# Altium PCB updated_pcb_file.PcbDoc (part 3 of 5)
Units mil, origin at the board's own origin, x right, y up, seen from the top; angles counter-clockwise.
Board outline 3385.83 x 2125.98 mil, 4 copper layers (L1 (TOP), L2 (GND), L3 (PWR), L4 (BOTTOM)), stack 38.228 mil thick; 154 components, 143 nets, 726 pads, 326 vias.
Unrouted connection lines stored in the file: 46.
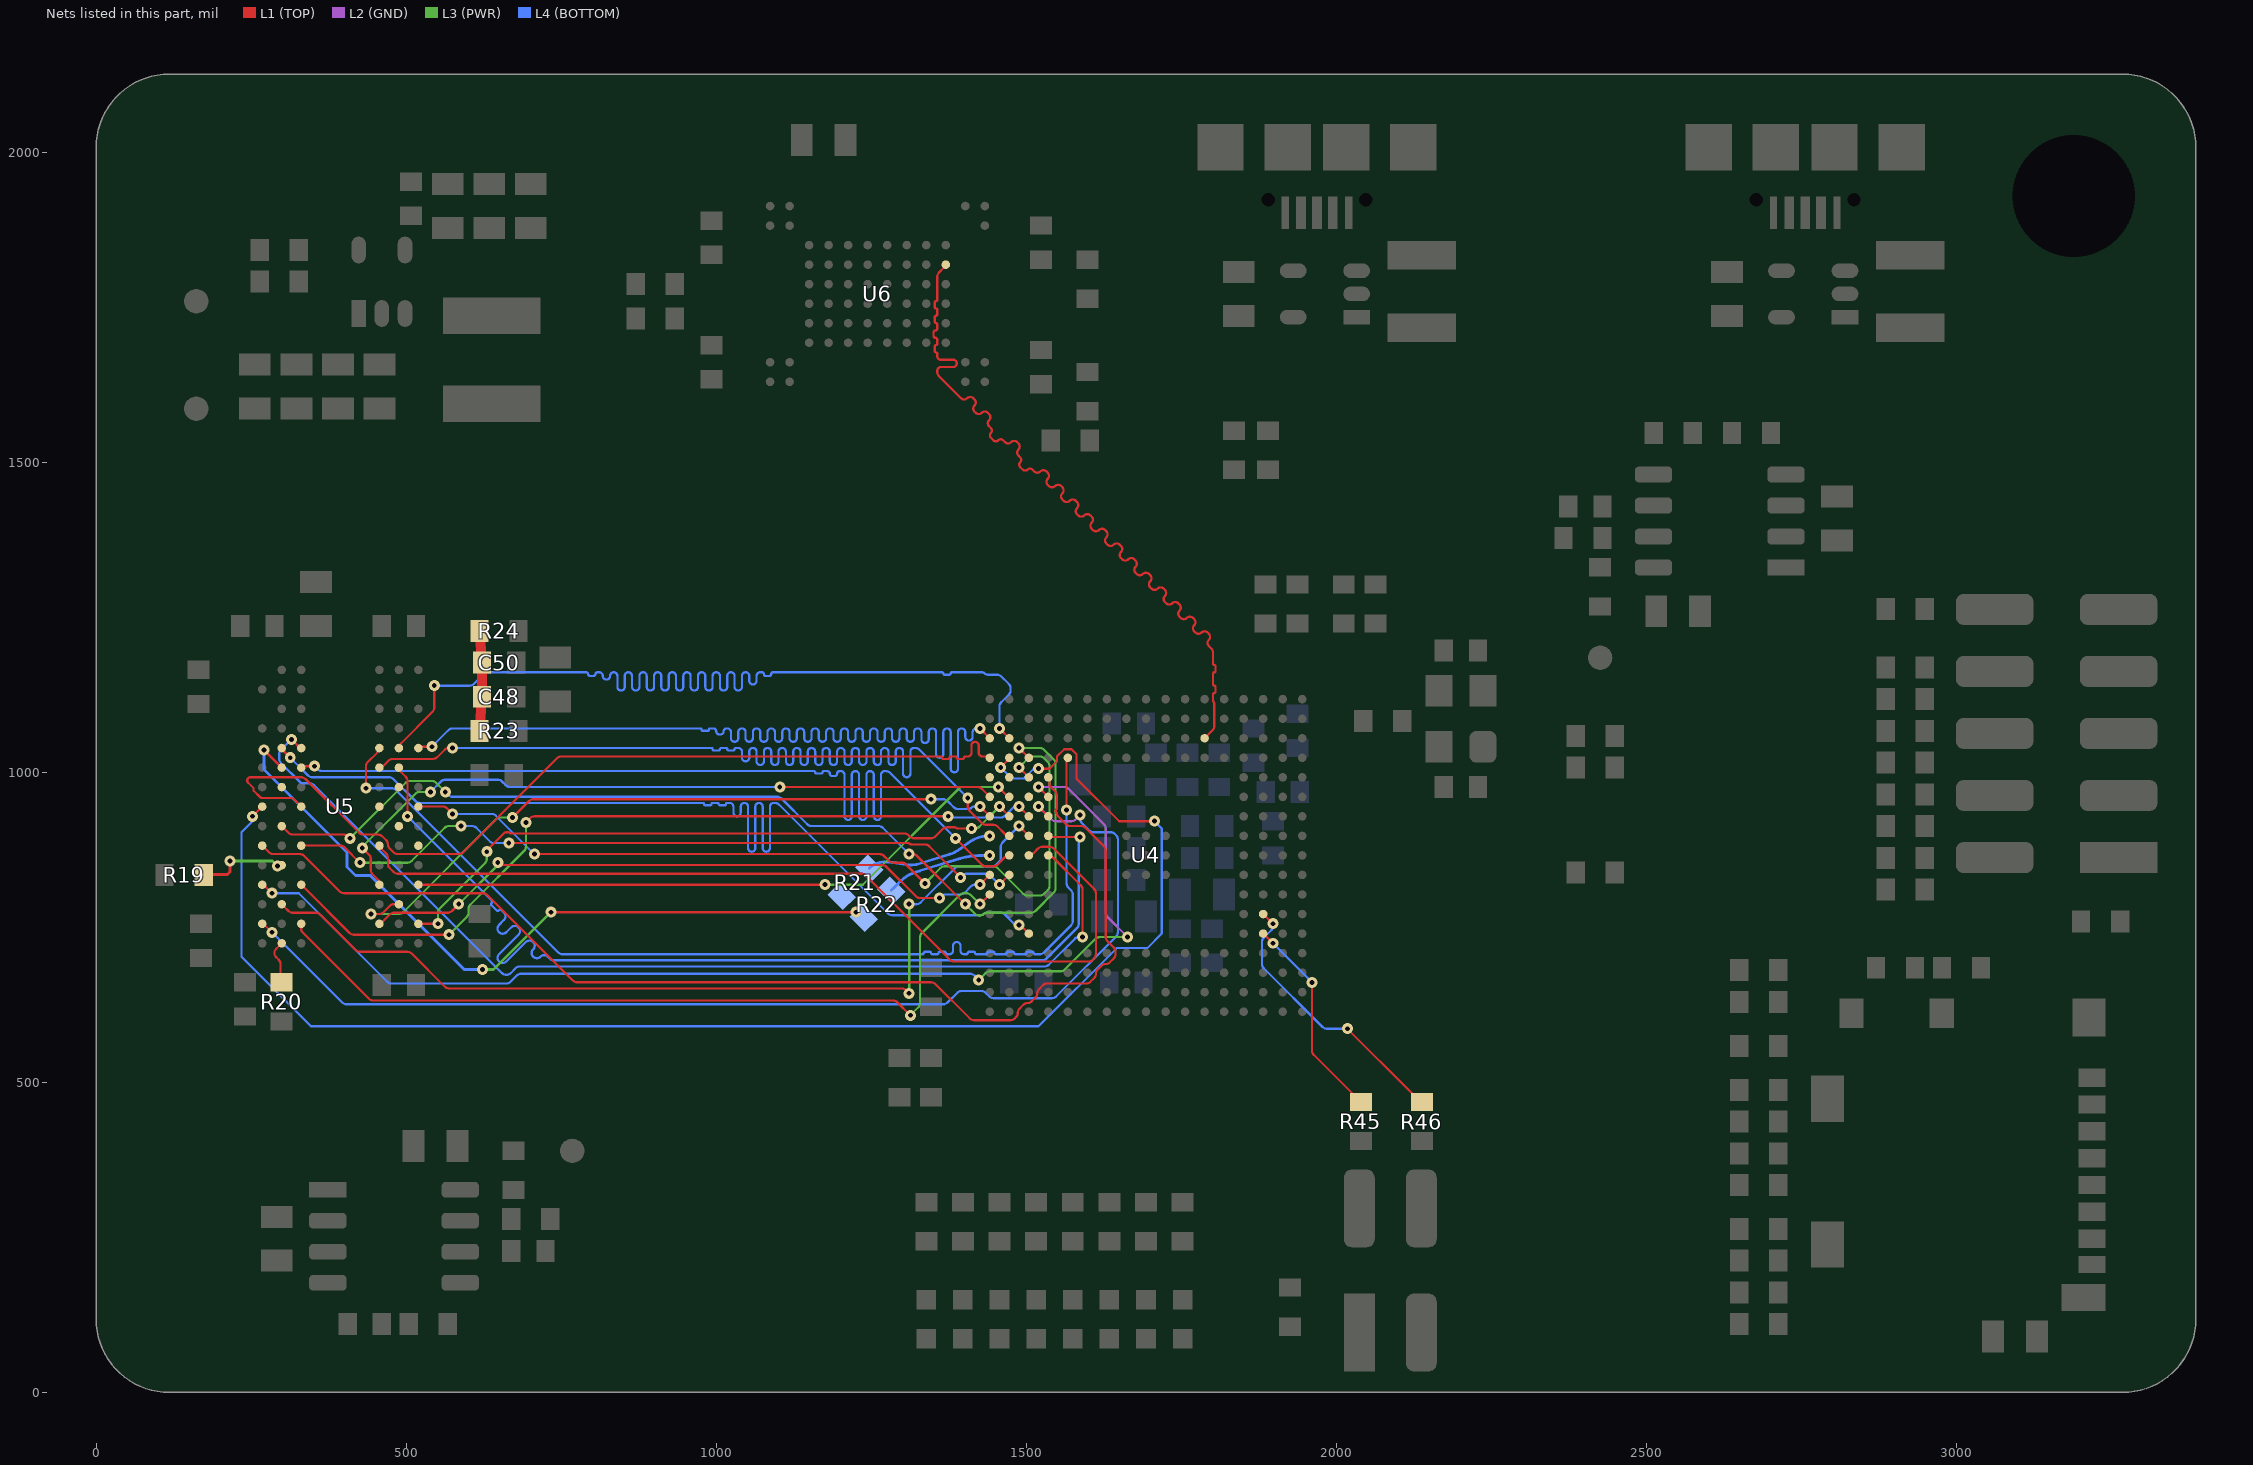
[diagram p5: the nets of this part, all layers, seen from the top]

## Via types
v1: diameter 17.72, hole 7.87, L1 (TOP) to L4 (BOTTOM), 310 vias
v2: diameter 13.78, hole 3.94, L1 (TOP) to L3 (PWR), 7 vias
v3: diameter 17.72, hole 7.87, L1 (TOP) to L3 (PWR), 5 vias
v4: diameter 13.78, hole 3.94, L2 (GND) to L4 (BOTTOM), 3 vias
v5: diameter 13.78, hole 3.94, L3 (PWR) to L4 (BOTTOM), 1 vias

## Nets (pads, with @x,y where several pads share a name; then routed paths per layer and width w, separated by ;. In a path a pad name is that pad's centre, name@x,y a point inside that pad or via, vN(x,y) a via of type N, cw(c..) or ccw(c..) an arc to the next point about the centre after c; other vN are vias at no path point) (continued)
DRAM_BA0: U4.B15 U5.L2 | length 1666.4
  L1 (TOP) w3.54: U5.L2@488.19,1039.37 489.42,1043.07 cw(c498.76,1039.96) 491.8,1046.92 542.39,1097.51 ccw(c535.43,1104.47) 545.27,1104.47 v1(545.27,1139.76) ; v1(1456.69,1070.87) U4.B15@1472.44,1055.12
  L4 (BOTTOM) w3.54: v1(545.27,1139.76) 602.22,1139.76 ccw(c602.22,1149.61) 609.18,1142.65 625.07,1158.53 cw(c632.03,1151.57) 632.03,1161.42 790.35,1161.42 cw(c790.35,1158.46) 793.31,1158.46 ccw(c796.26,1158.46) 796.26,1155.51 802.16,1155.51 ccw(c802.16,1158.46) 805.12,1158.46 cw(c808.07,1158.46) 808.07,1161.42 811.02,1161.42 cw(c811.02,1155.51) 816.93,1155.51 ccw(c822.83,1155.51) 822.83,1149.61 ccw(c822.83,1155.51) 828.74,1155.51 cw(c834.65,1155.51) 834.65,1161.42 cw(c834.65,1155.51) 840.55,1155.51 840.55,1137.79 ccw(c846.46,1137.79) 846.46,1131.89 ccw(c846.46,1137.79) 852.36,1137.79 852.36,1155.51 cw(c858.27,1155.51) 858.27,1161.42 cw(c858.27,1155.51) 864.17,1155.51 864.17,1137.79 ccw(c870.08,1137.79) 870.08,1131.89 ccw(c870.08,1137.79) 875.98,1137.79 875.98,1155.51 cw(c881.89,1155.51) 881.89,1161.42 cw(c881.89,1155.51) 887.79,1155.51 887.79,1137.79 ccw(c893.7,1137.79) 893.7,1131.89 ccw(c893.7,1137.79) 899.61,1137.79 899.61,1155.51 cw(c905.51,1155.51) 905.51,1161.42 cw(c905.51,1155.51) 911.42,1155.51 911.42,1137.79 ccw(c917.32,1137.79) 917.32,1131.89 ccw(c917.32,1137.79) 923.23,1137.79 923.23,1155.51 cw(c929.13,1155.51) 929.13,1161.42 cw(c929.13,1155.51) 935.04,1155.51 935.04,1137.79 ccw(c940.94,1137.79) 940.94,1131.89 ccw(c940.94,1137.79) 946.85,1137.79 946.85,1155.51 cw(c952.76,1155.51) 952.76,1161.42 cw(c952.76,1155.51) 958.66,1155.51 958.66,1137.79 ccw(c964.57,1137.79) 964.57,1131.89 ccw(c964.57,1137.79) 970.47,1137.79 970.47,1155.51 cw(c976.38,1155.51) 976.38,1161.42 cw(c976.38,1155.51) 982.28,1155.51 982.28,1137.79 ccw(c988.19,1137.79) 988.19,1131.89 ccw(c988.19,1137.79) 994.09,1137.79 994.09,1155.51 cw(c1000,1155.51) 1000,1161.42 cw(c1000,1155.51) 1005.9,1155.51 1005.9,1137.79 ccw(c1011.81,1137.79) 1011.81,1131.89 ccw(c1011.81,1137.79) 1017.72,1137.79 1017.72,1155.51 cw(c1023.62,1155.51) 1023.62,1161.42 cw(c1023.62,1155.51) 1029.53,1155.51 1029.53,1137.79 ccw(c1035.43,1137.79) 1035.43,1131.89 ccw(c1035.43,1137.79) 1041.34,1137.79 1041.34,1155.51 cw(c1047.24,1155.51) 1047.24,1161.42 cw(c1047.24,1155.51) 1053.15,1155.51 1053.15,1147.64 ccw(c1059.05,1147.64) 1059.05,1141.73 ccw(c1059.05,1147.64) 1064.96,1147.64 1064.96,1155.51 cw(c1070.87,1155.51) 1070.87,1161.42 1073.82,1161.42 cw(c1073.82,1158.46) 1076.77,1158.46 ccw(c1079.72,1158.46) 1079.72,1155.51 1085.63,1155.51 ccw(c1085.63,1158.46) 1088.58,1158.46 cw(c1091.53,1158.46) 1091.53,1161.42 1364.17,1161.42 cw(c1364.17,1159.45) 1366.14,1159.45 ccw(c1368.11,1159.45) 1368.11,1157.48 1375.98,1157.48 ccw(c1375.98,1159.45) 1377.95,1159.45 cw(c1379.92,1159.45) 1379.92,1161.42 1428.32,1161.42 cw(c1428.32,1154.7) 1433.07,1159.45 ccw(c1437.82,1164.2) 1437.82,1157.48 1452.62,1157.48 cw(c1452.62,1147.64) 1459.58,1154.6 1471.53,1142.65 cw(c1464.57,1135.69) 1474.41,1135.69 1474.41,1132.03 cw(c1464.57,1132.03) 1471.53,1125.07 1459.58,1113.12 ccw(c1466.53,1106.16) 1456.69,1106.16 v1(1456.69,1070.87)
DRAM_BA1: U4.E14 U5.L3 | length 1669.7
  L1 (TOP) w3.54: v1(435.04,974.41) 435.04,1009.7 cw(c444.88,1009.7) 437.92,1016.66 453.08,1031.82 ccw(c446.12,1038.78) 455.46,1035.67 U5.L3@456.69,1039.37 ; v1(1564.96,938.98) 1564.96,1016.12 cw(c1574.8,1016.12) 1565.47,1019.23 U4.E14@1566.93,1023.62
  L4 (BOTTOM) w3.54: v1(435.04,974.41) 476.24,974.41 cw(c476.24,964.57) 483.2,971.53 745.15,709.58 ccw(c752.11,716.54) 752.11,706.69 1332.68,706.69 ccw(c1332.68,708.66) 1334.64,708.66 cw(c1336.61,708.66) 1336.61,710.63 1344.49,710.63 cw(c1344.49,708.66) 1346.46,708.66 ccw(c1348.42,708.66) 1348.42,706.69 1356.3,706.69 ccw(c1356.3,708.66) 1358.27,708.66 cw(c1360.24,708.66) 1360.24,710.63 1368.11,710.63 cw(c1368.11,708.66) 1370.08,708.66 ccw(c1372.05,708.66) 1372.05,706.69 1375.98,706.69 ccw(c1375.98,712.6) 1381.89,712.6 1381.89,720.47 cw(c1387.79,720.47) 1387.79,726.38 cw(c1387.79,720.47) 1393.7,720.47 1393.7,712.6 ccw(c1399.61,712.6) 1399.61,706.69 1403.54,706.69 ccw(c1403.54,708.66) 1405.51,708.66 cw(c1407.48,708.66) 1407.48,710.63 1415.35,710.63 cw(c1415.35,708.66) 1417.32,708.66 ccw(c1419.29,708.66) 1419.29,706.69 1435.04,706.69 ccw(c1435.04,708.66) 1437.01,708.66 cw(c1438.98,708.66) 1438.98,710.63 1446.85,710.63 cw(c1446.85,708.66) 1448.82,708.66 ccw(c1450.79,708.66) 1450.79,706.69 1466.53,706.69 ccw(c1466.53,708.66) 1468.5,708.66 cw(c1470.47,708.66) 1470.47,710.63 1478.35,710.63 cw(c1478.35,708.66) 1480.31,708.66 ccw(c1482.28,708.66) 1482.28,706.69 1498.03,706.69 ccw(c1498.03,708.66) 1500,708.66 cw(c1501.97,708.66) 1501.97,710.63 1509.84,710.63 cw(c1509.84,708.66) 1511.81,708.66 ccw(c1513.78,708.66) 1513.78,706.69 1521.51,706.69 ccw(c1521.51,716.54) 1528.47,709.58 1571.92,753.02 ccw(c1564.96,759.98) 1574.8,759.98 1574.8,803.01 ccw(c1564.96,803.01) 1571.92,809.97 1567.84,814.05 cw(c1574.8,821.01) 1564.96,821.01 v1(1564.96,938.98)
DRAM_BA2: U4.A15 U5.L1 | length 1669.1
  L1 (TOP) w3.54: U5.L1@519.69,1039.37 524.07,1040.83 cw(c527.19,1031.5) 527.19,1041.34 v1(541.34,1041.34) ; v1(1425.2,1070.87) U4.A15@1440.94,1055.12
  L4 (BOTTOM) w3.54: v1(541.34,1041.34) 567.98,1067.98 cw(c574.94,1061.02) 574.94,1070.87 974.41,1070.87 cw(c974.41,1068.9) 976.38,1068.9 ccw(c978.35,1068.9) 978.35,1066.93 986.22,1066.93 ccw(c986.22,1068.9) 988.19,1068.9 cw(c990.16,1068.9) 990.16,1070.87 995.08,1070.87 cw(c995.08,1065.94) 1000,1065.94 ccw(c1004.92,1065.94) 1004.92,1061.02 1006.89,1061.02 ccw(c1006.89,1065.94) 1011.81,1065.94 cw(c1016.73,1065.94) 1016.73,1070.87 1017.72,1070.87 cw(c1017.72,1064.96) 1023.62,1064.96 1023.62,1055.12 ccw(c1029.53,1055.12) 1029.53,1049.21 ccw(c1029.53,1055.12) 1035.43,1055.12 1035.43,1064.96 cw(c1041.34,1064.96) 1041.34,1070.87 cw(c1041.34,1064.96) 1047.24,1064.96 1047.24,1055.12 ccw(c1053.15,1055.12) 1053.15,1049.21 ccw(c1053.15,1055.12) 1059.05,1055.12 1059.05,1064.96 cw(c1064.96,1064.96) 1064.96,1070.87 cw(c1064.96,1064.96) 1070.87,1064.96 1070.87,1055.12 ccw(c1076.77,1055.12) 1076.77,1049.21 ; 1076.77,1049.21 ccw(c1076.77,1055.12) 1082.68,1055.12 1082.68,1064.96 cw(c1088.58,1064.96) 1088.58,1070.87 cw(c1088.58,1064.96) 1094.49,1064.96 1094.49,1055.12 ccw(c1100.39,1055.12) 1100.39,1049.21 ccw(c1100.39,1055.12) 1106.3,1055.12 1106.3,1064.96 cw(c1112.2,1064.96) 1112.2,1070.87 cw(c1112.2,1064.96) 1118.11,1064.96 1118.11,1055.12 ccw(c1124.02,1055.12) 1124.02,1049.21 ccw(c1124.02,1055.12) 1129.92,1055.12 1129.92,1064.96 cw(c1135.83,1064.96) 1135.83,1070.87 cw(c1135.83,1064.96) 1141.73,1064.96 1141.73,1055.12 ccw(c1147.64,1055.12) 1147.64,1049.21 ccw(c1147.64,1055.12) 1153.54,1055.12 1153.54,1064.96 cw(c1159.45,1064.96) 1159.45,1070.87 cw(c1159.45,1064.96) 1165.35,1064.96 1165.35,1055.12 ccw(c1171.26,1055.12) 1171.26,1049.21 ccw(c1171.26,1055.12) 1177.16,1055.12 1177.16,1064.96 cw(c1183.07,1064.96) 1183.07,1070.87 cw(c1183.07,1064.96) 1188.98,1064.96 1188.98,1055.12 ccw(c1194.88,1055.12) 1194.88,1049.21 ccw(c1194.88,1055.12) 1200.79,1055.12 1200.79,1064.96 cw(c1206.69,1064.96) 1206.69,1070.87 cw(c1206.69,1064.96) 1212.6,1064.96 1212.6,1055.12 ccw(c1218.5,1055.12) 1218.5,1049.21 ccw(c1218.5,1055.12) 1224.41,1055.12 1224.41,1064.96 cw(c1230.31,1064.96) 1230.31,1070.87 cw(c1230.31,1064.96) 1236.22,1064.96 1236.22,1055.12 ccw(c1242.13,1055.12) 1242.13,1049.21 ccw(c1242.13,1055.12) 1248.03,1055.12 1248.03,1064.96 cw(c1253.94,1064.96) 1253.94,1070.87 cw(c1253.94,1064.96) 1259.84,1064.96 1259.84,1055.12 ccw(c1265.75,1055.12) 1265.75,1049.21 ccw(c1265.75,1055.12) 1271.65,1055.12 1271.65,1064.96 cw(c1277.56,1064.96) 1277.56,1070.87 cw(c1277.56,1064.96) 1283.46,1064.96 1283.46,1055.12 ccw(c1289.37,1055.12) 1289.37,1049.21 ccw(c1289.37,1055.12) 1295.27,1055.12 1295.27,1064.96 cw(c1301.18,1064.96) 1301.18,1070.87 cw(c1301.18,1064.96) 1307.09,1064.96 1307.09,1055.12 ccw(c1312.99,1055.12) 1312.99,1049.21 ccw(c1312.99,1055.12) 1318.9,1055.12 1318.9,1064.96 cw(c1324.8,1064.96) 1324.8,1070.87 cw(c1324.8,1064.96) 1330.71,1064.96 1330.71,1053.15 ccw(c1336.61,1053.15) 1336.61,1047.24 ccw(c1336.61,1053.15) 1342.52,1053.15 1342.52,1064.96 cw(c1348.42,1064.96) 1348.42,1070.87 cw(c1348.42,1064.96) 1354.33,1064.96 1354.33,1029.53 ccw(c1360.24,1029.53) 1360.24,1023.62 ccw(c1360.24,1029.53) 1366.14,1029.53 1366.14,1064.96 cw(c1372.05,1064.96) 1372.05,1070.87 cw(c1372.05,1064.96) 1377.95,1064.96 1377.95,1005.91 ccw(c1383.86,1005.91) 1383.86,1000 ccw(c1383.86,1005.91) 1389.76,1005.91 1389.76,1064.96 cw(c1395.67,1064.96) 1395.67,1070.87 cw(c1395.67,1064.96) 1401.57,1064.96 1401.57,1057.09 ccw(c1407.48,1057.09) 1407.48,1051.18 ccw(c1407.48,1057.09) 1413.39,1057.09 1413.39,1064.96 cw(c1419.29,1064.96) 1419.29,1070.87 v1(1425.2,1070.87)
DRAM_CAS: U4.D9 U5.L7 | length 1680.2
  L1 (TOP) w3.54: v1(314.96,1053.15) 324.11,1044 ccw(c325.79,1045.68) 325.79,1043.31 cw(c325.79,1040.93) 327.47,1042.61 U5.L7@330.71,1039.37 ; U4.D9@1535.43,866.14 1539.13,864.91 cw(c1536.02,855.57) 1542.98,862.53 1587.67,817.84 cw(c1580.71,810.88) 1590.55,810.88 v1(1590.55,734.25)
  L4 (BOTTOM) w3.54: v1(314.96,1053.15) 298.16,1036.35 ccw(c305.12,1029.39) 295.27,1029.39 295.27,1021.79 ccw(c305.12,1021.79) 298.16,1014.83 327.83,985.17 ccw(c334.79,992.13) 334.78,982.28 344.35,982.28 cw(c344.35,972.44) 351.31,979.4 654.46,676.25 ccw(c661.42,683.21) 668.38,676.25 676.25,684.12 cw(c683.21,677.17) 683.21,687.01 1529.39,687.01 ccw(c1529.39,696.85) 1536.35,689.89 1577.83,731.37 cw(c1584.79,724.41) 1584.78,734.25 v1(1590.55,734.25)
DRAM_CKE: U4.D10 U5.K2 | length 1654.7
  L1 (TOP) w3.54: U5.K2@488.19,1007.87 489.42,1004.17 ccw(c498.76,1007.28) 491.8,1000.32 499.09,993.04 cw(c492.13,986.08) 501.97,986.08 v1(501.97,929.13) ; U4.D10@1535.43,897.64 1539.82,896.17 ccw(c1542.94,905.51) 1542.94,895.67 v1(1586.61,895.67)
  L4 (BOTTOM) w3.54: v1(501.97,929.13) 637.79,793.31 cw(c635.83,791.34) 637.79,789.37 ccw(c639.76,787.4) 637.79,785.43 645.67,777.56 ccw(c647.64,779.53) 649.61,777.56 cw(c651.57,775.59) 653.54,777.56 657.48,773.62 cw(c651.57,767.72) 657.48,761.81 649.61,753.94 ccw(c655.51,748.03) 649.61,742.13 ccw(c655.51,748.03) 661.42,742.13 669.29,750 cw(c675.2,744.09) 681.1,750 cw(c675.2,744.09) 681.1,738.19 649.61,706.69 ccw(c655.51,700.79) 649.61,694.88 ccw(c655.51,700.79) 661.42,694.88 692.91,726.38 cw(c698.82,720.47) 704.72,726.38 cw(c698.82,720.47) 704.72,714.57 ccw(c710.63,708.66) 704.72,702.76 ccw(c710.63,708.66) 716.53,702.76 cw(c722.44,696.85) 728.35,702.76 731.37,699.73 ccw(c738.33,706.69) 738.33,696.85 1525.45,696.85 ccw(c1525.45,706.69) 1532.41,699.73 1581.76,749.09 ccw(c1574.8,756.05) 1584.65,756.05 1584.65,892.31 cw(c1588.01,892.31) 1585.63,894.68 v1(1586.61,895.67)
DRAM_CLK_N: R22.1 U4.A9 | length 173
  L4 (BOTTOM) w4.33: R22.1@1282.11,809.67 1286.28,813.84 1288.18,815.74 1289.98,817.53 1291.67,819.2 1293.27,820.77 1294.78,822.24 1296.22,823.61 1297.59,824.89 1298.91,826.09 1300.17,827.21 1301.39,828.26 1302.58,829.24 1303.74,830.15 1304.89,831 1306.03,831.81 1307.16,832.56 1308.31,833.27 1309.48,833.95 1310.67,834.59 1311.89,835.2 1313.16,835.79 1314.48,836.37 1315.85,836.94 1317.3,837.49 1318.82,838.05 1320.43,838.61 1322.13,839.19 1323.93,839.77 1325.84,840.38 1327.87,841.01 1384.84,858.6 1386.72,859.17 1388.52,859.72 1390.27,860.24 1391.96,860.74 1393.6,861.21 1395.2,861.66 1396.78,862.08 1398.33,862.48 1399.87,862.85 1401.41,863.2 1402.95,863.53 1404.5,863.84 1406.08,864.12 1407.68,864.38 1409.32,864.63 1411.01,864.85 1412.75,865.05 1414.55,865.24 1416.43,865.4 1418.38,865.55 1420.43,865.68 1422.57,865.79 1424.81,865.89 1427.17,865.97 1429.65,866.03 1432.26,866.08 1435,866.11 1437.9,866.14 v1(1440.94,866.14)
DRAM_CLK_P: R21.1 U4.A10 | length 207.8
  L4 (BOTTOM) w4.33: R21.1@1246.68,845.11 1248.93,847.18 1251.23,848.98 1253.59,850.53 1256.01,851.84 1258.47,852.93 1260.97,853.8 1263.52,854.48 1266.09,854.99 1268.7,855.33 1271.33,855.52 1273.98,855.57 1276.65,855.51 1279.33,855.35 1282.02,855.1 1284.71,854.77 1287.4,854.38 1290.08,853.96 1292.76,853.5 1295.41,853.03 1298.05,852.57 1300.67,852.12 1303.25,851.7 1305.8,851.34 1308.32,851.03 1310.79,850.8 1313.22,850.67 1315.6,850.64 1317.92,850.74 1320.18,850.97 1322.38,851.36 1324.5,851.92 1377.47,868.27 1379.53,868.96 1381.51,869.75 1383.44,870.62 1385.31,871.57 1387.14,872.59 1388.92,873.67 1390.67,874.8 1392.39,875.97 1394.1,877.19 1395.79,878.43 1397.48,879.7 1400.86,882.26 1402.58,883.55 1404.31,884.83 1406.08,886.08 1407.88,887.32 1409.73,888.52 1411.63,889.68 1413.58,890.8 1415.6,891.85 1417.7,892.85 1419.87,893.77 1422.13,894.61 1424.48,895.37 1426.93,896.03 1429.49,896.59 1432.17,897.04 1434.96,897.37 1437.89,897.57 v1(1440.94,897.64)
DRAM_CLK_R_N: R22.2 U5.K8 | length 1212.3
  L1 (TOP) w4.33: v1(270.71,1036.28) 298.27,1008.72 U5.K8@299.21,1007.87 ; v1(733.31,774.46) v1(1225.44,774.46)
  L3 (PWR) w4.33: v1(623.07,681.94) 640.79,681.94 v1(733.31,774.46)
  L4 (BOTTOM) w4.33: v1(270.71,1036.28) 270.71,1004.78 404.57,870.92 404.57,847.3 418.35,833.52 441.97,833.52 593.55,681.94 v1(623.07,681.94)
DRAM_CLK_R_P: R21.2 U5.J8
DRAM_CS: U4.C5 U5.L8 | length 1669.1
  L1 (TOP) w3.54: U5.L8@299.21,1039.37 302.45,1036.13 cw(c300.77,1034.45) 303.15,1034.45 ccw(c305.53,1034.45) 303.84,1032.77 v1(312.99,1023.62) ; v1(1488.19,753.94) 1488.19,755.91 U4.C5@1503.94,740.16
  L4 (BOTTOM) w3.54: v1(312.99,1023.62) 341.6,995.01 ccw(c348.56,1001.97) 348.56,992.13 472.3,992.13 cw(c472.3,982.28) 479.26,989.24 514.83,953.67 ccw(c521.79,960.63) 521.79,950.79 978.35,950.79 cw(c978.35,948.82) 980.31,948.82 ccw(c982.28,948.82) 982.28,946.85 990.16,946.85 ccw(c990.16,948.82) 992.13,948.82 cw(c994.09,948.82) 994.09,950.79 1001.97,950.79 cw(c1001.97,948.82) 1003.94,948.82 ccw(c1005.9,948.82) 1005.9,946.85 1013.78,946.85 ccw(c1013.78,948.82) 1015.75,948.82 cw(c1017.72,948.82) 1017.72,950.79 1021.65,950.79 cw(c1021.65,944.88) 1027.56,944.88 1027.56,935.04 ccw(c1033.46,935.04) 1033.46,929.13 ccw(c1033.46,935.04) 1039.37,935.04 1039.37,944.88 cw(c1045.27,944.88) 1045.27,950.79 cw(c1045.27,944.88) 1051.18,944.88 1051.18,877.95 ccw(c1057.09,877.95) 1057.09,872.05 ccw(c1057.09,877.95) 1062.99,877.95 1062.99,944.88 cw(c1068.9,944.88) 1068.9,950.79 cw(c1068.9,944.88) 1074.8,944.88 1074.8,877.95 ccw(c1080.71,877.95) 1080.71,872.05 ccw(c1080.71,877.95) 1086.61,877.95 1086.61,944.88 cw(c1092.52,944.88) 1092.52,950.79 1094.35,950.79 cw(c1094.35,940.94) 1101.31,947.9 1276.64,772.57 ccw(c1283.6,779.53) 1283.6,769.68 1426.35,769.68 ccw(c1426.35,776.41) 1431.1,771.65 cw(c1435.85,766.9) 1435.85,773.62 1458.52,773.62 cw(c1458.52,763.78) 1465.48,770.74 1480.19,756.02 ccw(c1485.24,761.07) 1485.24,753.94 v1(1488.19,753.94)
DRAM_D0: U4.C14 U5.G8 | length 1693
  L1 (TOP) w3.54: U5.G8@299.21,913.39 303.15,909.45 310.11,902.49 ccw(c317.07,909.45) 317.07,899.61 399.47,899.61 cw(c399.47,889.76) 406.43,896.72 v1(409.45,893.7) ; v1(1311.02,868.11) 1316.79,868.11 cw(c1316.79,858.27) 1323.75,865.23 v1(1401.57,787.4) ; v1(1488.19,1039.37) U4.C14@1503.94,1023.62
  L3 (PWR) w3.54: v1(409.45,893.7) 499.09,983.34 cw(c506.04,976.38) 506.04,986.22 541.2,986.22 cw(c541.2,976.38) 548.16,983.34 v1(562.99,968.5) ; v1(1401.57,787.4) 1416.41,772.57 ccw(c1423.37,779.53) 1423.37,769.68 1426.35,769.68 ccw(c1426.35,776.41) 1431.1,771.65 cw(c1435.85,766.9) 1435.85,773.62 1507.73,773.62 ccw(c1507.73,783.46) 1514.69,776.5 1544.36,806.17 ccw(c1537.4,813.13) 1547.24,813.13 1547.24,1013.64 ccw(c1537.4,1013.64) 1544.36,1020.6 1528.47,1036.49 ccw(c1521.51,1029.53) 1521.51,1039.37 v1(1488.19,1039.37)
  L4 (BOTTOM) w3.54: v1(562.99,968.5) 567.98,963.51 ccw(c574.94,970.47) 574.94,960.63 1099,960.63 cw(c1099,957.27) 1101.38,959.65 1101.67,959.36 ccw(c1103.35,961.04) 1103.35,958.66 cw(c1103.35,956.29) 1105.03,957.97 1146.72,916.27 ccw(c1153.68,923.23) 1153.68,913.39 1261.67,913.39 cw(c1261.67,903.54) 1268.63,910.5 v1(1311.02,868.11)
DRAM_D1: U4.B13 U5.G2
DRAM_D2: U4.A14 U5.H7 | length 1471.9
  L1 (TOP) w3.54: U5.H7@330.71,944.88 326.77,948.82 319.81,955.78 ccw(c312.85,948.82) 312.85,958.66 267.79,958.66 cw(c267.79,963.58) 264.31,960.1 253.94,970.47 253.94,974.41 245.08,983.27 cw(c248.75,986.94) 248.75,992.13 330.57,992.13 cw(c330.57,982.28) 337.53,989.24 424.28,902.49 ccw(c431.24,909.45) 431.24,899.61 454.58,899.61 cw(c454.58,889.76) 461.54,896.72 467.69,890.58 cw(c460.97,883.86) 470.47,883.86 ccw(c479.98,883.86) 473.26,877.14 479.4,870.99 ccw(c486.36,877.95) 486.36,868.11 584.51,868.11 ccw(c584.51,877.95) 591.46,870.99 743.18,1022.71 cw(c750.14,1015.75) 750.14,1025.59 1362.2,1025.59 cw(c1362.2,1023.62) 1364.17,1023.62 ccw(c1366.14,1023.62) 1366.14,1021.65 1374.02,1021.65 ccw(c1374.02,1023.62) 1375.98,1023.62 cw(c1377.95,1023.62) 1377.95,1025.59 1385.83,1025.59 cw(c1385.83,1023.62) 1387.79,1023.62 ccw(c1389.76,1023.62) 1389.76,1021.65 1397.64,1021.65 ccw(c1397.64,1023.62) 1399.61,1023.62 cw(c1401.57,1023.62) 1401.57,1025.59 1405.51,1025.59 ccw(c1405.51,1031.5) 1411.42,1031.5 1411.42,1043.31 cw(c1417.32,1043.31) 1417.32,1049.21 cw(c1417.32,1043.31) 1423.23,1043.31 1423.23,1031.5 ccw(c1429.13,1031.5) 1429.13,1025.59 1433.44,1025.59 cw(c1433.44,1015.75) 1436.55,1025.09 U4.A14@1440.94,1023.62
DRAM_D3: U4.A13 U5.H3
DRAM_D4: U4.C13 U5.H1 | length 1384
  L1 (TOP) w3.54: U5.H1@519.69,944.88 525.59,944.88 558.91,944.88 cw(c558.91,935.04) 565.87,942 v1(574.8,933.07) ; v1(706.69,868.11) 1263.64,868.11 cw(c1263.64,858.27) 1270.6,865.23 1278.61,857.21 ccw(c1285.57,864.17) 1285.57,854.33 1299.07,854.33 cw(c1299.07,844.49) 1306.03,851.45 v1(1336.61,820.87) ; v1(1488.19,1007.87) U4.C13@1503.94,992.13
  L3 (PWR) w3.54: v1(1336.61,820.87) 1361.29,845.54 cw(c1368.25,838.58) 1368.25,848.42 1446.71,848.42 cw(c1446.71,838.58) 1453.67,845.54 1495.15,804.06 ccw(c1502.11,811.02) 1502.11,801.18 1521.51,801.18 ccw(c1521.51,811.02) 1528.47,804.06 1534.52,810.11 ccw(c1527.56,817.07) 1537.4,817.07 1537.4,1009.7 ccw(c1527.56,1009.7) 1534.52,1016.66 1528.47,1022.71 ccw(c1521.51,1015.75) 1521.51,1025.59 1509.98,1025.59 ccw(c1509.98,1015.75) 1503.02,1022.71 v1(1488.19,1007.87)
  L4 (BOTTOM) w3.54: v1(574.8,933.07) 637.65,933.07 cw(c637.65,923.23) 644.61,930.19 v1(706.69,868.11)
DRAM_D5: U4.B14 U5.H9 | length 2406.9
  L1 (TOP) w3.54: v1(251.97,929.13) U5.H9@267.72,944.88 ; v1(1458.66,1007.87) 1468.5,1017.72 1468.5,1019.69 U4.B14@1472.44,1023.62 ; v1(1519.69,1005.91) 1537.4,1005.91 1549.21,1017.72 1549.21,1025.59 1561.02,1037.4 1572.83,1037.4 1580.71,1029.53 1580.71,990.16 1649.61,921.26 v1(1706.69,921.26)
  L4 (BOTTOM) w3.54: v1(251.97,929.13) 251.97,921.26 234.25,903.54 234.25,702.76 346.46,590.55 1519.69,590.55 1645.67,716.54 1694.88,716.54 1718.5,740.16 1718.5,909.45 v1(1706.69,921.26) ; v1(1458.66,1007.87) 1476.38,990.16 1496.06,990.16 1511.81,1005.91 v1(1519.69,1005.91)
DRAM_D6: U4.C12 U5.F1
DRAM_D7: U4.D13 U5.F9 | length 1886.7
  L1 (TOP) w3.54: U5.F9@267.72,881.89 271.65,877.95 278.61,870.99 ccw(c285.57,877.95) 285.57,868.11 328.6,868.11 cw(c328.6,858.27) 335.56,865.23 392.79,808 ccw(c399.75,814.96) 399.75,805.12 623.88,805.12 cw(c623.88,795.28) 630.83,802.24 768.77,664.3 ccw(c775.73,671.26) 775.73,661.42 1346.32,661.42 cw(c1346.32,651.57) 1353.28,658.53 1408.53,603.28 ccw(c1415.49,610.24) 1415.49,600.39 1474.27,600.39 ccw(c1474.27,610.24) 1481.23,603.28 1483.44,605.48 ccw(c1476.72,612.2) 1486.22,612.2 cw(c1495.72,612.2) 1489,618.93 1495.25,625.17 cw(c1501.97,618.45) 1501.97,627.95 ccw(c1501.97,637.46) 1508.69,630.74 1514.93,636.98 ccw(c1508.21,643.7) 1517.72,643.7 cw(c1527.22,643.7) 1520.5,650.42 1526.64,656.57 cw(c1533.6,649.61) 1533.6,659.45 1596.32,659.45 ccw(c1596.32,669.29) 1603.28,662.33 1609.42,668.48 ccw(c1602.7,675.2) 1612.2,675.2 cw(c1621.71,675.2) 1614.99,681.92 1621.23,688.16 cw(c1627.95,681.44) 1627.95,690.94 ccw(c1627.95,700.45) 1634.67,693.73 1640.82,699.87 ccw(c1633.86,706.83) 1643.7,706.83 1643.7,710.49 ccw(c1633.86,710.49) 1640.82,717.45 1630.84,727.43 cw(c1637.79,734.39) 1627.95,734.39 1627.95,873.88 ccw(c1618.11,873.88) 1625.07,880.84 1595.4,910.5 ccw(c1588.44,903.54) 1588.44,913.39 1571.01,913.39 cw(c1571.01,923.23) 1564.05,916.27 1550.6,929.71 cw(c1553.96,933.07) 1549.21,933.07 1549.21,933.65 ccw(c1545.85,933.65) 1548.23,936.02 1547.94,936.31 cw(c1549.62,937.99) 1547.24,937.99 cw(c1549.62,937.99) 1547.94,939.67 1548.23,939.96 ccw(c1545.85,942.34) 1549.21,942.34 1549.21,962.46 ccw(c1539.37,962.46) 1546.33,969.42 1540.18,975.56 cw(c1546.91,982.28) 1537.4,982.28 1537.4,984.62 ccw(c1527.56,984.62) 1536.9,987.74 U4.D13@1535.43,992.13
DRAM_D8: U4.C10 U5.C8 | length 1477
  L1 (TOP) w3.54: U5.C8@299.21,787.4 303.15,783.46 310.11,776.5 ccw(c317.07,783.46) 317.07,773.62 354.19,773.62 cw(c354.19,763.78) 361.15,770.74 418.38,713.51 ccw(c425.34,720.47) 425.34,710.63 501.83,710.63 cw(c501.83,700.79) 508.79,707.75 562.08,654.46 ccw(c569.04,661.42) 569.04,651.57 1299.07,651.57 cw(c1299.07,641.73) 1306.03,648.69 v1(1311.02,643.7) ; v1(1488.19,913.39) U4.C10@1503.94,897.64
  L3 (PWR) w3.54: v1(1311.02,643.7) v1(1311.02,787.4)
  L4 (BOTTOM) w3.54: v1(1311.02,787.4) 1322.69,787.4 ccw(c1322.69,797.24) 1329.65,790.28 1384.91,845.54 cw(c1391.87,838.58) 1391.87,848.42 1444.74,848.42 ccw(c1444.74,858.27) 1451.7,851.31 1455.78,855.38 ccw(c1448.82,862.34) 1458.66,862.34 1458.66,879.78 cw(c1468.5,879.78) 1461.54,886.74 v1(1488.19,913.39)
DRAM_D9: U4.A11 U5.C2 | length 1137.7
  L1 (TOP) w3.54: v1(442.91,771.65) 456.55,771.65 ccw(c456.55,781.5) 463.51,774.54 474.29,785.31 cw(c479.33,780.27) 479.33,787.4 482.28,787.4 U5.C2@488.19,787.4 ; v1(671.26,927.17) 697.9,953.81 cw(c704.86,946.85) 704.86,956.69 v1(1346.46,956.69) ; v1(1425.2,944.88) U4.A11@1440.94,929.13
  L3 (PWR) w3.54: v1(442.91,771.65) 488.05,771.65 ccw(c488.05,781.5) 495.01,774.54 644.75,924.28 cw(c651.71,917.32) 651.71,927.17 v1(671.26,927.17)
  L4 (BOTTOM) w3.54: v1(1346.46,956.69) 1366,956.69 cw(c1366,946.85) 1372.96,953.81 1382.94,943.83 ccw(c1389.9,950.79) 1389.9,940.94 1406.66,940.94 ccw(c1406.66,947.67) 1411.42,942.91 cw(c1416.17,938.16) 1416.17,944.88 v1(1425.2,944.88)
DRAM_D10: U4.C11 U5.D7 | length 1330.8
  L1 (TOP) w3.54: U5.D7@330.71,818.9 334.65,814.96 408.53,741.07 ccw(c415.49,748.03) 415.49,738.19 v1(568.9,738.19) ; v1(692.91,919.29) 699.87,926.25 cw(c706.83,919.29) 706.83,929.13 v1(1374.02,929.13) ; v1(1488.19,944.88) U4.C11@1503.94,929.13
  L3 (PWR) w3.54: v1(568.9,738.19) 597.51,766.8 ccw(c590.55,773.76) 600.39,773.76 600.39,779.39 cw(c610.24,779.39) 603.28,786.35 690.03,873.1 ccw(c683.07,880.06) 692.91,880.06 v1(692.91,919.29)
  L4 (BOTTOM) w3.54: v1(1374.02,929.13) 1375,928.15 ccw(c1377.38,930.53) 1377.38,927.17 1458.52,927.17 ccw(c1458.52,937.01) 1465.48,930.05 1477.53,942.1 cw(c1484.25,935.38) 1484.25,944.88 v1(1488.19,944.88)
DRAM_D11: U4.A12 U5.D3 | length 1137.1
  L1 (TOP) w3.54: v1(429.13,877.95) 440.03,867.06 cw(c433.07,860.1) 442.91,860.1 442.91,842.66 ccw(c452.76,842.66) 445.8,835.7 454.6,826.89 cw(c449.56,821.85) 456.69,821.85 U5.D3@456.69,818.9 ; v1(1102.36,976.38) 1421.12,976.38 cw(c1421.12,966.54) 1428.08,973.49 U4.A12@1440.94,960.63
  L3 (PWR) w3.54: v1(429.13,877.95) 429.13,878.94 cw(c431.51,878.94) 429.83,880.62 514.83,965.62 cw(c521.79,958.66) 521.79,968.5 v1(539.37,968.5)
  L4 (BOTTOM) w3.54: v1(539.37,968.5) 556.17,985.31 cw(c563.13,978.35) 563.13,988.19 647.5,988.19 cw(c647.5,978.35) 654.46,985.31 660.5,979.26 ccw(c667.46,986.22) 667.46,976.38 v1(1102.36,976.38)
DRAM_D12: U4.B12 U5.D1 | length 1024.2
  L1 (TOP) w3.54: U5.D1@519.69,818.9 525.59,818.9 v1(1175.2,818.9) ; v1(1454.72,976.38) 1468.5,962.6 U4.B12@1472.44,960.63
  L3 (PWR) w3.54: v1(1175.2,818.9) 1236.22,818.9 1393.7,976.38 v1(1454.72,976.38)
DRAM_D13: U4.D12 U5.D9 | length 1846.7
  L1 (TOP) w3.54: U5.D9@267.72,818.9 270.23,817.64 cw(c265.82,808.84) 272.78,815.8 v1(283.46,805.12) ; v1(1519.68,976.38) U4.D12@1535.43,960.63
  L2 (GND) w3.54: v1(1519.68,976.38) 1560.88,976.38 cw(c1560.88,966.54) 1567.84,973.49 1625.07,916.27 cw(c1618.11,909.31) 1627.95,909.31 1627.95,773.76 ccw(c1637.79,773.76) 1630.83,766.8 v1(1663.39,734.25)
  L3 (PWR) w3.54: v1(1423.23,665.35) 1434.12,676.25 cw(c1441.08,669.29) 1441.08,679.13 1554.98,679.13 ccw(c1554.98,688.98) 1561.94,682.02 1611.29,731.37 cw(c1618.25,724.41) 1618.25,734.25 v1(1663.39,734.25)
  L4 (BOTTOM) w3.54: v1(283.46,805.12) 326.77,805.12 469.56,662.33 ccw(c476.52,669.29) 476.52,659.45 661.28,659.45 ccw(c661.28,669.29) 668.24,662.33 678.22,672.31 cw(c685.18,665.35) 685.18,675.2 1409.31,675.2 cw(c1409.31,665.35) 1416.27,672.31 v1(1423.23,665.35)
DRAM_D14: U4.B11 U5.B1 | length 1066.5
  L1 (TOP) w3.54: U5.B1@519.69,755.91 525.59,755.91 v1(551.18,755.91) ; v1(629.92,872.05) 629.92,873.03 cw(c632.3,873.03) 630.62,874.71 657.36,901.46 cw(c662.4,896.41) 662.4,903.54 663.96,903.54 cw(c663.96,900.18) 666.34,902.56 ccw(c668.71,904.93) 668.71,901.57 1303.01,901.57 cw(c1303.01,891.73) 1309.97,898.69 1312.08,896.58 ccw(c1319.04,903.54) 1319.04,893.7 1346.32,893.7 ccw(c1346.32,903.54) 1353.28,896.58 1365.23,908.53 cw(c1372.19,901.57) 1372.19,911.42 1384.43,911.42 cw(c1384.43,908.06) 1386.81,910.43 ccw(c1389.19,912.81) 1389.19,909.45 v1(1411.42,909.45) ; v1(1456.69,944.88) U4.B11@1472.44,929.13
  L3 (PWR) w3.54: v1(551.18,755.91) 551.18,773.48 cw(c561.02,773.48) 554.06,780.44 627.04,853.42 ccw(c620.08,860.38) 629.92,860.38 v1(629.92,872.05) ; v1(1411.42,909.45) 1417.18,909.45 ccw(c1417.18,919.29) 1424.14,912.33 v1(1456.69,944.88)
DRAM_D15: U4.D11 U5.B9 | length 1826.1
  L1 (TOP) w3.54: U5.B9@267.72,755.91 270.23,754.65 cw(c265.82,745.85) 272.78,752.81 v1(283.46,742.13) ; v1(1519.68,944.88) U4.D11@1535.43,929.13
  L2 (GND) w3.54: v1(1519.68,944.88) 1540.42,924.14 ccw(c1547.38,931.1) 1547.38,921.26 1572.69,921.26 ccw(c1572.69,931.1) 1579.65,924.14 v1(1586.61,931.1)
  L4 (BOTTOM) w3.54: v1(283.46,742.13) 396.72,628.87 ccw(c403.68,635.83) 403.68,625.98 1366,625.98 ccw(c1366,635.83) 1372.96,628.87 1388.85,644.75 cw(c1395.81,637.79) 1395.81,647.64 1427.02,647.64 cw(c1427.02,637.79) 1433.98,644.75 1440.03,638.71 ccw(c1446.99,645.67) 1446.99,635.83 1541.2,635.83 ccw(c1541.2,645.67) 1548.16,638.71 1644.75,735.31 ccw(c1637.79,742.27) 1647.64,742.27 1647.64,891.59 ccw(c1637.79,891.59) 1644.75,898.55 1642.65,900.66 ccw(c1635.69,893.7) 1635.69,903.54 1608.41,903.54 cw(c1608.41,913.39) 1601.45,906.43 1589.5,918.38 cw(c1596.46,925.34) 1586.61,925.34 v1(1586.61,931.1)
DRAM_LDM: U4.C9 U5.F3 | length 1492.2
  L1 (TOP) w3.54: U5.F3@456.69,881.89 457.95,879.38 ccw(c466.75,883.78) 459.79,876.82 467.59,869.02 cw(c460.63,862.06) 470.47,862.06 470.47,852.5 ccw(c480.31,852.5) 473.35,845.54 479.4,839.5 ccw(c486.36,846.46) 486.36,836.61 1234.11,836.61 cw(c1234.11,826.77) 1241.07,833.73 1377.04,697.76 ccw(c1384,704.72) 1384,694.88 1600.25,694.88 ccw(c1600.25,704.72) 1607.21,697.76 1609.32,699.87 ccw(c1602.36,706.83) 1612.2,706.83 1612.2,804.98 ccw(c1602.36,804.98) 1609.32,811.94 1544.22,877.04 ccw(c1537.26,870.08) 1537.26,879.92 1525.73,879.92 ccw(c1525.73,870.08) 1518.77,877.04 1511.48,869.75 cw(c1504.53,876.71) 1507.64,867.38 U4.C9@1503.94,866.14
DRAM_LDQSn: R19.2 U5.E8 | length 149.6
  L1 (TOP) w4.72: R19.2@173.23,834.65 176.22,835.49 211.66,835.49 215.59,839.43 v1(215.59,857.14) ; v1(292.37,849.27) 294.33,851.24 U5.E8@299.21,850.39
  L3 (PWR) w4.72: v1(215.59,857.14) 284.49,857.14 v1(292.37,849.27)
DRAM_LDQSp: U4.B8 U5.F7 | length 1224.5
  L1 (TOP) w3.54: U5.F7@330.71,881.89 336.61,881.89 393.56,881.89 cw(c393.56,872.05) 400.52,879.01 v1(425.2,854.33) ; v1(665.35,885.83) 1309.63,885.83 cw(c1309.63,882.47) 1312.01,884.84 ccw(c1314.38,887.22) 1314.38,883.86 1336.47,883.86 cw(c1336.47,874.02) 1343.43,880.98 v1(1393.7,830.71) ; v1(1456.69,818.9) U4.B8@1472.44,834.65
  L3 (PWR) w3.54: v1(425.2,854.33) 501.83,854.33 ccw(c501.83,864.17) 508.79,857.21 562.08,910.5 cw(c569.04,903.54) 569.04,913.39 v1(588.58,913.39)
  L4 (BOTTOM) w3.54: v1(588.58,913.39) 606.16,913.39 cw(c606.16,903.54) 613.12,910.5 634.91,888.71 ccw(c641.87,895.67) 641.87,885.83 v1(665.35,885.83) ; v1(1393.7,830.71) 1396.72,833.73 cw(c1403.68,826.77) 1403.68,836.61 1434.9,836.61 cw(c1434.9,826.77) 1441.86,833.73 v1(1456.69,818.9)
DRAM_RAS: U4.B9 U5.K7 | length 1669.5
  L1 (TOP) w3.54: U5.K7@330.71,1007.87 335.1,1009.34 cw(c338.21,1000) 338.21,1009.84 v1(352.36,1009.84) ; v1(1385.83,893.7) 1428.22,851.31 ccw(c1435.18,858.27) 1435.18,848.42 1446.71,848.42 ccw(c1446.71,858.27) 1453.67,851.31 1464.89,862.53 cw(c1471.85,855.57) 1468.74,864.91 U4.B9@1472.44,866.14
  L4 (BOTTOM) w3.54: v1(352.36,1009.84) 357.35,1004.85 ccw(c364.31,1011.81) 364.31,1001.97 1157.48,1001.97 cw(c1157.48,1000) 1159.45,1000 ccw(c1161.42,1000) 1161.42,998.03 1169.29,998.03 ccw(c1169.29,1000) 1171.26,1000 cw(c1173.23,1000) 1173.23,1001.97 1179.13,1001.97 cw(c1179.13,998.03) 1183.07,998.03 ccw(c1187.01,998.03) 1187.01,994.09 1190.94,994.09 ccw(c1190.94,998.03) 1194.88,998.03 cw(c1198.82,998.03) 1198.82,1001.97 1200.79,1001.97 cw(c1200.79,996.06) 1206.69,996.06 1206.69,929.13 ccw(c1212.6,929.13) 1212.6,923.23 ccw(c1212.6,929.13) 1218.5,929.13 1218.5,996.06 cw(c1224.41,996.06) 1224.41,1001.97 cw(c1224.41,996.06) 1230.31,996.06 1230.31,929.13 ccw(c1236.22,929.13) 1236.22,923.23 ccw(c1236.22,929.13) 1242.13,929.13 1242.13,996.06 cw(c1248.03,996.06) 1248.03,1001.97 cw(c1248.03,996.06) 1253.94,996.06 1253.94,929.13 ccw(c1259.84,929.13) 1259.84,923.23 ccw(c1259.84,929.13) 1265.75,929.13 1265.75,996.06 cw(c1271.65,996.06) 1271.65,1001.97 1273.48,1001.97 cw(c1273.48,992.13) 1280.44,999.09 v1(1385.83,893.7)
DRAM_UDM: U4.A8 U5.B3 | length 1062.6
  L1 (TOP) w3.54: U5.B3@456.69,755.91 459.2,757.16 ccw(c454.8,765.96) 461.76,759 473.49,770.74 cw(c480.45,763.78) 480.45,773.62 566.79,773.62 ccw(c566.79,783.46) 573.75,776.5 v1(584.65,787.4) ; v1(647.64,854.33) 649.61,852.36 ccw(c654.36,857.11) 654.36,850.39 1267.58,850.39 cw(c1267.58,840.55) 1274.54,847.51 1321.92,800.13 ccw(c1328.88,807.09) 1328.88,797.24 v1(1360.24,797.24) ; v1(1425.2,818.9) U4.A8@1440.94,834.65
  L3 (PWR) w3.54: v1(584.65,787.4) 646.25,849 ccw(c642.88,852.36) 647.64,852.36 v1(647.64,854.33)
  L4 (BOTTOM) w3.54: v1(1360.24,797.24) 1363.26,800.27 cw(c1370.22,793.31) 1370.22,803.15 1393.56,803.15 ccw(c1393.56,812.99) 1400.52,806.03 1410.5,816.01 cw(c1417.46,809.05) 1417.46,818.9 v1(1425.2,818.9)
DRAM_UDQSn: R20.2 U5.A8 | length 70.8
  L1 (TOP) w3.54: R20.2@299.21,661.42 297.24,675.2 297.24,690.81 ccw(c287.4,690.81) 294.36,697.76 290.35,701.77 cw(c297.24,708.66) 290.35,715.55 U5.A8@299.21,724.41
DRAM_UDQSp: U4.A7 U5.B7 | length 1337.7
  L1 (TOP) w3.54: U5.B7@330.71,755.91 330.71,750 330.71,747.05 ccw(c337.84,747.05) 332.8,742.01 440.03,634.77 ccw(c446.99,641.73) 446.99,631.89 1285.29,631.89 cw(c1285.29,622.05) 1292.25,629.01 v1(1312.99,608.27) ; v1(1425.2,787.4) U4.A7@1440.94,803.15
  L3 (PWR) w3.54: v1(1312.99,608.27) 1325.86,621.13 ccw(c1318.9,628.09) 1328.74,628.09 1328.74,734.11 cw(c1338.58,734.11) 1331.62,741.07 1392.79,802.24 cw(c1399.75,795.28) 1399.75,805.12 1403.4,805.12 cw(c1403.4,795.28) 1410.36,802.24 v1(1425.2,787.4)
DRAM_VREF: C48.1 C50.2 R23.1 R24.2 U5.J2 | length 161.7
  L1 (TOP) w15.75: R23.1@618.11,1066.93 622.05,1122.05 622.05,1177.17 R24.2@618.11,1228.35
DRAM_WE: U4.B10 U5.K3 | length 1670.1
  L1 (TOP) w3.54: U5.K3@456.69,1007.87 460.39,1009.11 ccw(c457.28,1018.45) 464.24,1011.49 471.53,1018.77 cw(c478.49,1011.81) 478.49,1021.65 543.17,1021.65 ccw(c543.17,1031.5) 550.13,1024.54 562.08,1036.49 cw(c569.04,1029.53) 569.04,1039.37 v1(574.8,1039.37) ; v1(1405.51,958.66) 1405.51,945.02 ccw(c1415.35,945.02) 1408.39,938.06 1428.22,918.24 ccw(c1435.18,925.2) 1435.18,915.35 1446.71,915.35 cw(c1446.71,905.51) 1453.67,912.47 1464.89,901.25 ccw(c1471.85,908.21) 1468.74,898.87 U4.B10@1472.44,897.64
  L4 (BOTTOM) w3.54: v1(574.8,1039.37) 992.13,1039.37 cw(c992.13,1037.4) 994.09,1037.4 ccw(c996.06,1037.4) 996.06,1035.43 1003.94,1035.43 ccw(c1003.94,1037.4) 1005.9,1037.4 cw(c1007.87,1037.4) 1007.87,1039.37 1015.75,1039.37 cw(c1015.75,1037.4) 1017.72,1037.4 ccw(c1019.68,1037.4) 1019.68,1035.43 1027.56,1035.43 ccw(c1027.56,1037.4) 1029.53,1037.4 cw(c1031.5,1037.4) 1031.5,1039.37 1035.43,1039.37 cw(c1035.43,1033.46) 1041.34,1033.46 1041.34,1023.62 ccw(c1047.24,1023.62) 1047.24,1017.72 ccw(c1047.24,1023.62) 1053.15,1023.62 1053.15,1033.46 cw(c1059.05,1033.46) 1059.05,1039.37 cw(c1059.05,1033.46) 1064.96,1033.46 1064.96,1017.72 ccw(c1070.87,1017.72) 1070.87,1011.81 ccw(c1070.87,1017.72) 1076.77,1017.72 ; 1076.77,1017.72 1076.77,1033.46 cw(c1082.68,1033.46) 1082.68,1039.37 cw(c1082.68,1033.46) 1088.58,1033.46 1088.58,1017.72 ccw(c1094.49,1017.72) 1094.49,1011.81 ccw(c1094.49,1017.72) 1100.39,1017.72 1100.39,1033.46 cw(c1106.3,1033.46) 1106.3,1039.37 cw(c1106.3,1033.46) 1112.2,1033.46 1112.2,1017.72 ccw(c1118.11,1017.72) 1118.11,1011.81 ccw(c1118.11,1017.72) 1124.02,1017.72 1124.02,1033.46 cw(c1129.92,1033.46) 1129.92,1039.37 cw(c1129.92,1033.46) 1135.83,1033.46 1135.83,1017.72 ccw(c1141.73,1017.72) 1141.73,1011.81 ccw(c1141.73,1017.72) 1147.64,1017.72 1147.64,1033.46 cw(c1153.54,1033.46) 1153.54,1039.37 cw(c1153.54,1033.46) 1159.45,1033.46 1159.45,1017.72 ccw(c1165.35,1017.72) 1165.35,1011.81 ccw(c1165.35,1017.72) 1171.26,1017.72 1171.26,1033.46 cw(c1177.16,1033.46) 1177.16,1039.37 cw(c1177.16,1033.46) 1183.07,1033.46 1183.07,1017.72 ccw(c1188.98,1017.72) 1188.98,1011.81 ccw(c1188.98,1017.72) 1194.88,1017.72 1194.88,1033.46 cw(c1200.79,1033.46) 1200.79,1039.37 cw(c1200.79,1033.46) 1206.69,1033.46 1206.69,1017.72 ccw(c1212.6,1017.72) 1212.6,1011.81 ccw(c1212.6,1017.72) 1218.5,1017.72 1218.5,1033.46 cw(c1224.41,1033.46) 1224.41,1039.37 cw(c1224.41,1033.46) 1230.31,1033.46 1230.31,1017.72 ccw(c1236.22,1017.72) 1236.22,1011.81 ccw(c1236.22,1017.72) 1242.13,1017.72 1242.13,1033.46 cw(c1248.03,1033.46) 1248.03,1039.37 cw(c1248.03,1033.46) 1253.94,1033.46 1253.94,1017.72 ccw(c1259.84,1017.72) 1259.84,1011.81 ccw(c1259.84,1017.72) 1265.75,1017.72 1265.75,1033.46 cw(c1271.65,1033.46) 1271.65,1039.37 cw(c1271.65,1033.46) 1277.56,1033.46 1277.56,1017.72 ccw(c1283.46,1017.72) 1283.46,1011.81 ccw(c1283.46,1017.72) 1289.37,1017.72 1289.37,1033.46 cw(c1295.27,1033.46) 1295.27,1039.37 cw(c1295.27,1033.46) 1301.18,1033.46 1301.18,998.03 ccw(c1307.09,998.03) 1307.09,992.13 ccw(c1307.09,998.03) 1312.99,998.03 1312.99,1033.46 cw(c1318.9,1033.46) 1318.9,1039.37 1320.73,1039.37 cw(c1320.73,1029.53) 1327.69,1036.49 v1(1405.51,958.66)
DRXD: R45.2 U4.R5 | length 336.5
  L1 (TOP) w3.54: U4.R5@1881.89,740.16 v1(1897.64,724.41) ; v1(1960.63,661.42) 1960.63,551.32 ccw(c1970.47,551.32) 1963.51,544.36 2025.59,482.28 R45.2@2039.37,468.5
  L4 (BOTTOM) w3.54: v1(1897.64,724.41) v1(1960.63,661.42)
DTXD: R46.2 U4.R6 | length 444.7
  L1 (TOP) w3.54: U4.R6@1881.89,771.65 v1(1897.64,755.91) ; v1(2017.72,586.61) 2122.05,482.28 R46.2@2137.8,468.5
  L4 (BOTTOM) w3.54: v1(1897.64,755.91) 1897.64,751.97 cw(c1888.13,751.97) 1894.85,745.25 1882.8,733.2 ccw(c1889.76,726.24) 1879.92,726.24 1879.92,691.08 ccw(c1889.76,691.08) 1882.8,684.12 1977.43,589.5 ccw(c1984.39,596.46) 1984.39,586.61 v1(2017.72,586.61)
FLASH_ALE: U4.M15 U6.C4 | length 1304.6
  L1 (TOP) w3.54: U6.C4@1370.08,1818.9 1368.82,1816.39 cw(c1360.02,1820.79) 1366.98,1813.83 1359.18,1806.03 ccw(c1366.14,1799.07) 1356.3,1799.07 1356.3,1761.81 cw(c1354.33,1761.81) 1354.33,1759.84 ccw(c1354.33,1757.87) 1352.36,1757.87 1352.36,1750 ccw(c1354.33,1750) 1354.33,1748.03 cw(c1354.33,1746.06) 1356.3,1746.06 1356.3,1738.19 cw(c1354.33,1738.19) 1354.33,1736.22 ccw(c1354.33,1734.25) 1352.36,1734.25 1352.36,1726.38 ccw(c1354.33,1726.38) 1354.33,1724.41 cw(c1354.33,1722.44) 1356.3,1722.44 1356.3,1715.55 cw(c1353.35,1715.55) 1353.35,1712.6 ccw(c1353.35,1709.65) 1350.39,1709.65 1350.39,1703.74 ccw(c1353.35,1703.74) 1353.35,1700.79 cw(c1353.35,1697.83) 1356.3,1697.83 1356.3,1690.94 cw(c1354.33,1690.94) 1354.33,1688.98 ccw(c1354.33,1687.01) 1352.36,1687.01 1352.36,1679.13 ccw(c1354.33,1679.13) 1354.33,1677.17 cw(c1354.33,1675.2) 1356.3,1675.2 1356.3,1671.26 ccw(c1362.2,1671.26) 1362.2,1665.35 1381.89,1665.35 cw(c1381.89,1659.45) 1387.79,1659.45 cw(c1381.89,1659.45) 1381.89,1653.54 1362.2,1653.54 ccw(c1362.2,1647.64) 1356.3,1647.64 1356.3,1645.81 ccw(c1366.14,1645.81) 1359.18,1638.85 1394.68,1603.35 ccw(c1399.61,1608.27) 1404.53,1603.35 cw(c1409.45,1598.42) 1414.37,1603.35 1416.34,1601.38 cw(c1411.42,1596.46) 1416.34,1591.54 ccw(c1421.26,1586.61) 1416.34,1581.69 1418.31,1579.72 ccw(c1423.23,1584.65) 1428.15,1579.72 cw(c1433.07,1574.8) 1437.99,1579.72 1439.96,1577.76 cw(c1435.04,1572.83) 1439.96,1567.91 ccw(c1444.88,1562.99) 1439.96,1558.07 1442.91,1555.12 cw(c1438.98,1551.18) 1442.91,1547.24 ccw(c1446.85,1543.31) 1442.91,1539.37 1446.85,1535.43 ccw(c1450.79,1539.37) 1454.72,1535.43 cw(c1458.66,1531.5) 1462.6,1535.43 1465.55,1532.48 ccw(c1470.47,1537.4) 1475.39,1532.48 cw(c1480.31,1527.56) 1485.24,1532.48 1487.2,1530.51 cw(c1482.28,1525.59) 1487.2,1520.67 ccw(c1492.13,1515.75) 1487.2,1510.83 1490.16,1507.87 cw(c1486.22,1503.94) 1490.16,1500 ccw(c1494.09,1496.06) 1490.16,1492.13 1494.09,1488.19 ccw(c1498.03,1492.13) 1501.97,1488.19 cw(c1505.9,1484.25) 1509.84,1488.19 1512.79,1485.24 ccw(c1517.72,1490.16) 1522.64,1485.24 cw(c1527.56,1480.31) 1532.48,1485.24 1534.45,1483.27 cw(c1529.53,1478.35) 1534.45,1473.42 ccw(c1539.37,1468.5) 1534.45,1463.58 1536.42,1461.61 ccw(c1541.34,1466.54) 1546.26,1461.61 cw(c1551.18,1456.69) 1556.1,1461.61 1558.07,1459.65 cw(c1553.15,1454.72) 1558.07,1449.8 ccw(c1562.99,1444.88) 1558.07,1439.96 1560.04,1437.99 ccw(c1564.96,1442.91) 1569.88,1437.99 cw(c1574.8,1433.07) 1579.72,1437.99 1581.69,1436.02 cw(c1576.77,1431.1) 1581.69,1426.18 ccw(c1586.61,1421.26) 1581.69,1416.34 1583.66,1414.37 ccw(c1588.58,1419.29) 1593.5,1414.37 cw(c1598.42,1409.45) 1603.35,1414.37 1605.31,1412.4 cw(c1600.39,1407.48) 1605.31,1402.56 ccw(c1610.24,1397.64) 1605.31,1392.72 1607.28,1390.75 ccw(c1612.2,1395.67) 1617.13,1390.75 cw(c1622.05,1385.83) 1626.97,1390.75 1628.94,1388.78 cw(c1624.02,1383.86) 1628.94,1378.94 ccw(c1633.86,1374.02) 1628.94,1369.09 1630.9,1367.13 ccw(c1635.83,1372.05) 1640.75,1367.13 cw(c1645.67,1362.2) 1650.59,1367.13 1652.56,1365.16 cw(c1647.64,1360.24) 1652.56,1355.31 ccw(c1657.48,1350.39) 1652.56,1345.47 1654.53,1343.5 ccw(c1659.45,1348.42) 1664.37,1343.5 cw(c1669.29,1338.58) 1674.21,1343.5 1676.18,1341.54 cw(c1671.26,1336.61) 1676.18,1331.69 ccw(c1681.1,1326.77) 1676.18,1321.85 1678.15,1319.88 ccw(c1683.07,1324.8) 1687.99,1319.88 cw(c1692.91,1314.96) 1697.83,1319.88 1699.8,1317.91 cw(c1694.88,1312.99) 1699.8,1308.07 ccw(c1704.72,1303.15) 1699.8,1298.23 1701.77,1296.26 ; 1701.77,1296.26 ccw(c1706.69,1301.18) 1711.61,1296.26 cw(c1716.53,1291.34) 1721.46,1296.26 1723.42,1294.29 cw(c1718.5,1289.37) 1723.42,1284.45 ccw(c1728.35,1279.53) 1723.42,1274.61 1725.39,1272.64 ccw(c1730.31,1277.56) 1735.24,1272.64 cw(c1740.16,1267.72) 1745.08,1272.64 1747.05,1270.67 cw(c1742.13,1265.75) 1747.05,1260.83 ccw(c1751.97,1255.91) 1747.05,1250.98 1749.02,1249.02 ccw(c1753.94,1253.94) 1758.86,1249.02 cw(c1763.78,1244.09) 1768.7,1249.02 1770.67,1247.05 cw(c1765.75,1242.13) 1770.67,1237.2 ccw(c1775.59,1232.28) 1770.67,1227.36 1772.64,1225.39 ccw(c1777.56,1230.31) 1782.48,1225.39 cw(c1787.4,1220.47) 1792.32,1225.39 1794.29,1223.42 cw(c1789.37,1218.5) 1794.29,1213.58 ccw(c1799.21,1208.66) 1794.29,1203.74 1798.3,1199.73 cw(c1791.34,1192.77) 1801.18,1192.77 1801.18,1175.2 ccw(c1803.15,1175.2) 1803.15,1173.23 cw(c1803.15,1171.26) 1805.12,1171.26 1805.12,1163.39 cw(c1803.15,1163.39) 1803.15,1161.42 ccw(c1803.15,1159.45) 1801.18,1159.45 1801.18,1141.73 ccw(c1803.15,1141.73) 1803.15,1139.76 cw(c1803.15,1137.79) 1805.12,1137.8 1805.12,1129.92 cw(c1803.15,1129.92) 1803.15,1127.95 ccw(c1803.15,1125.98) 1801.18,1125.98 1801.18,1115.56 ccw(c1804.54,1115.56) 1802.16,1113.19 cw(c1799.79,1110.81) 1803.15,1110.81 1803.15,1074.94 cw(c1793.31,1074.94) 1800.27,1067.98 U4.M15@1787.4,1055.12